# Altium PCB Power_MUX_PCB.PcbDoc (part 1 of 2)
Units mm, origin at the board's own origin, x right, y up, seen from the top; angles counter-clockwise.
Board outline 240.97 x 124.5 mm, 4 copper layers (Top Layer, Layer2_GND, Layer3_Inner, Bottom Layer 1), stack 1.548 mm thick; 112 components, 60 nets, 297 pads, 576 vias.
Unrouted connection lines stored in the file: 2.
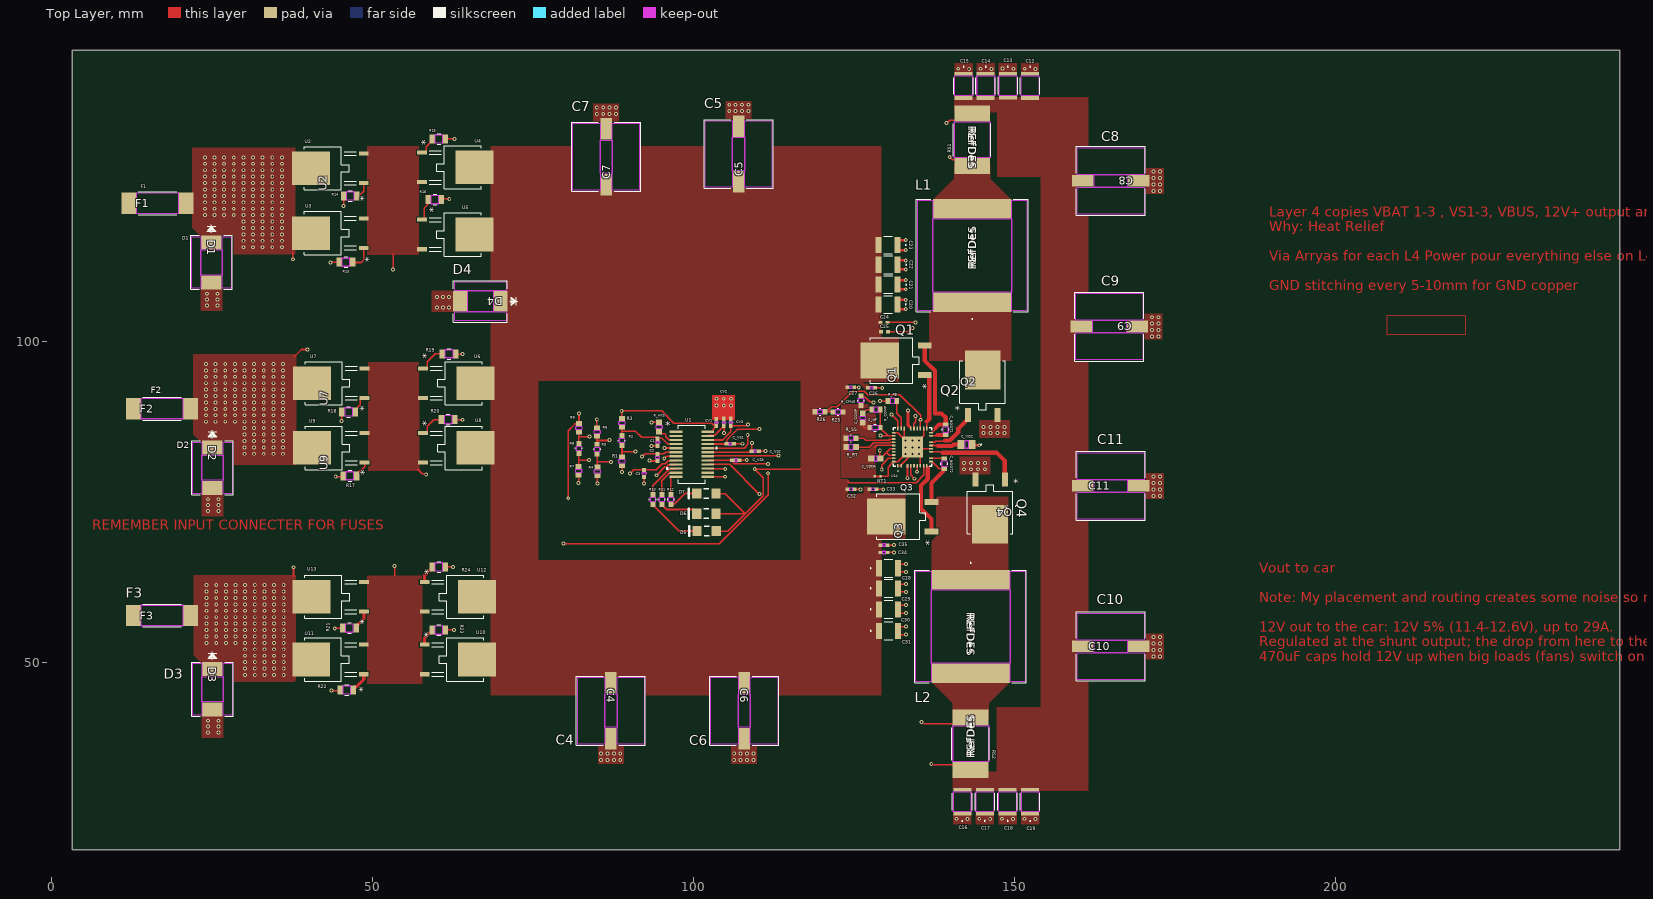
[diagram p0: Top Layer view]
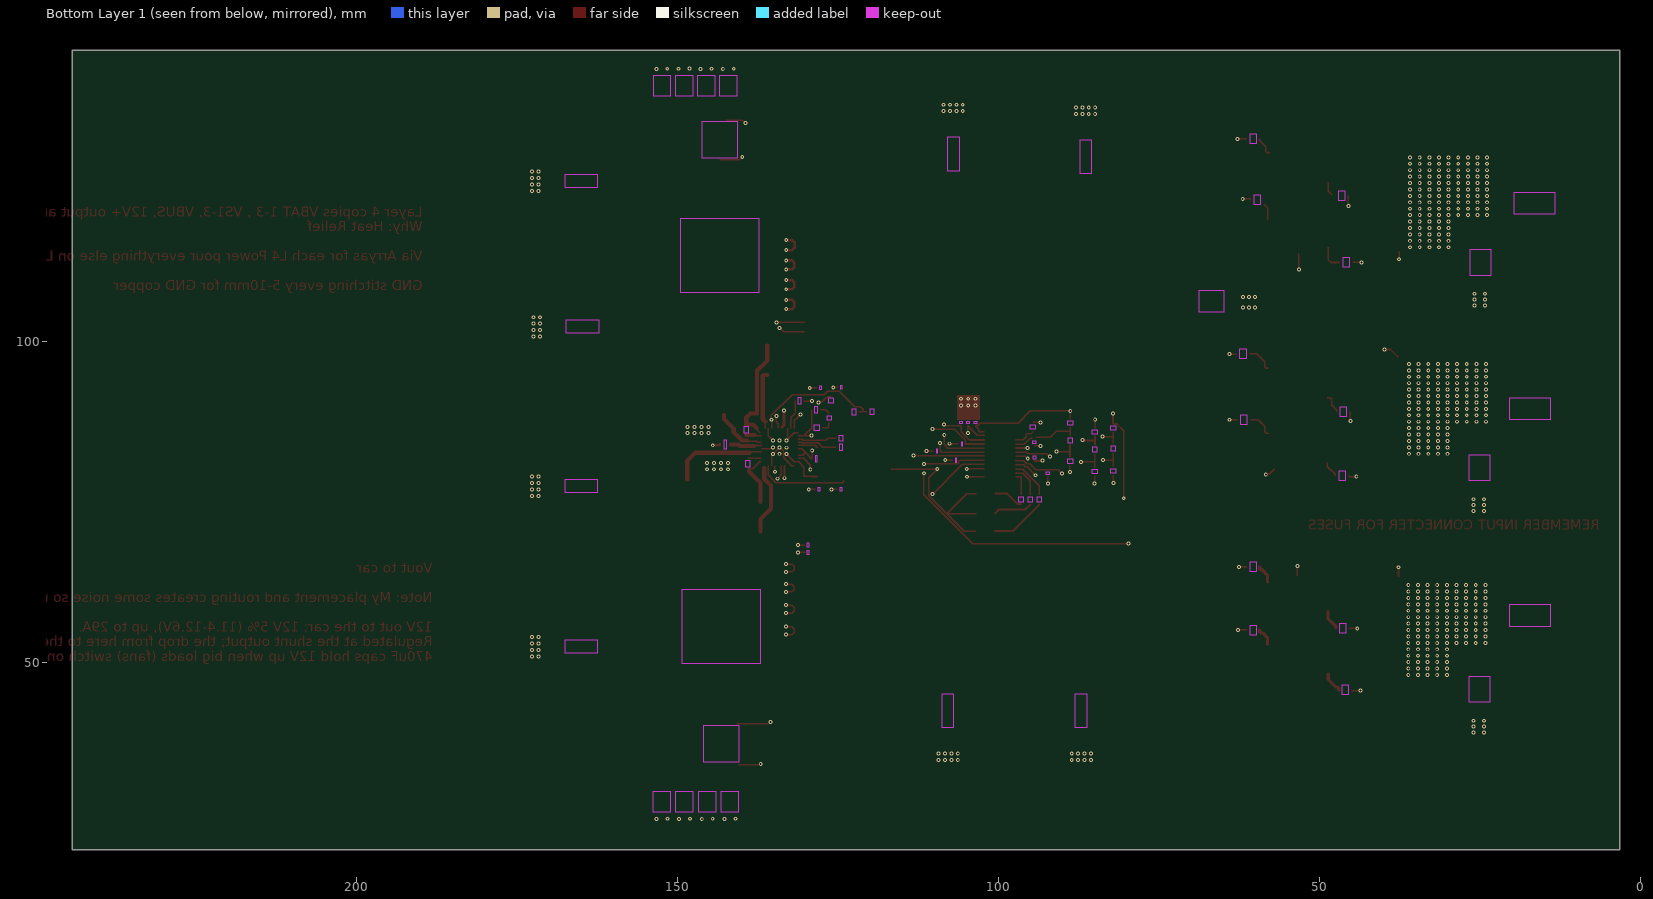
[diagram p1: Bottom Layer 1 view, seen from below]
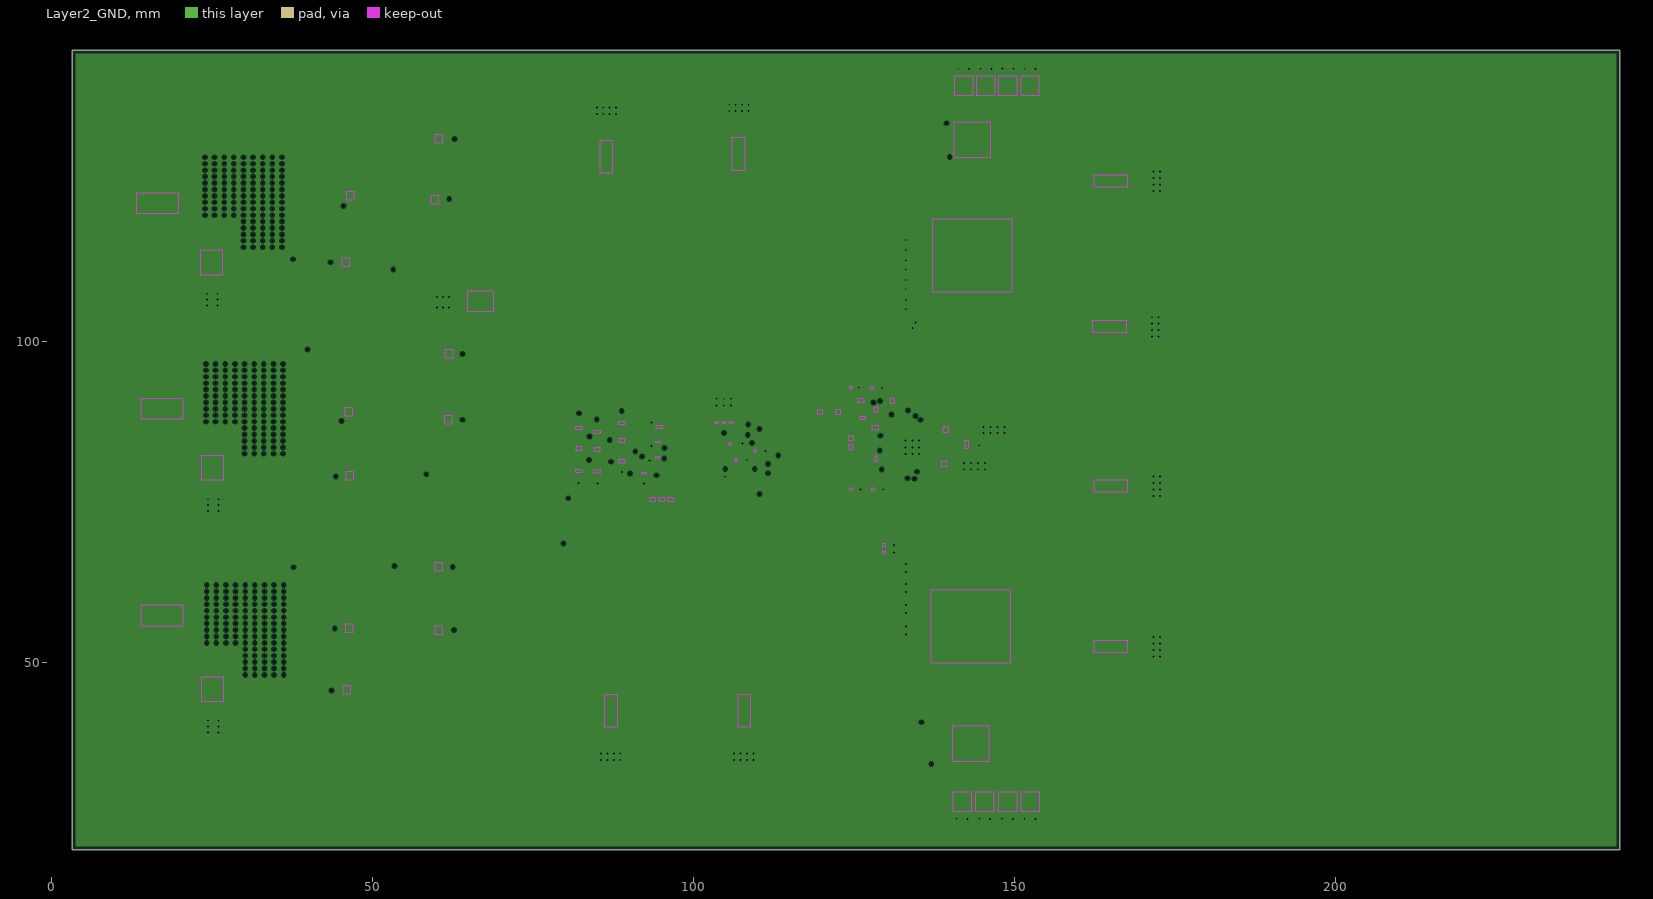
[diagram p2: Layer2_GND, clearances drawn from the general rule]
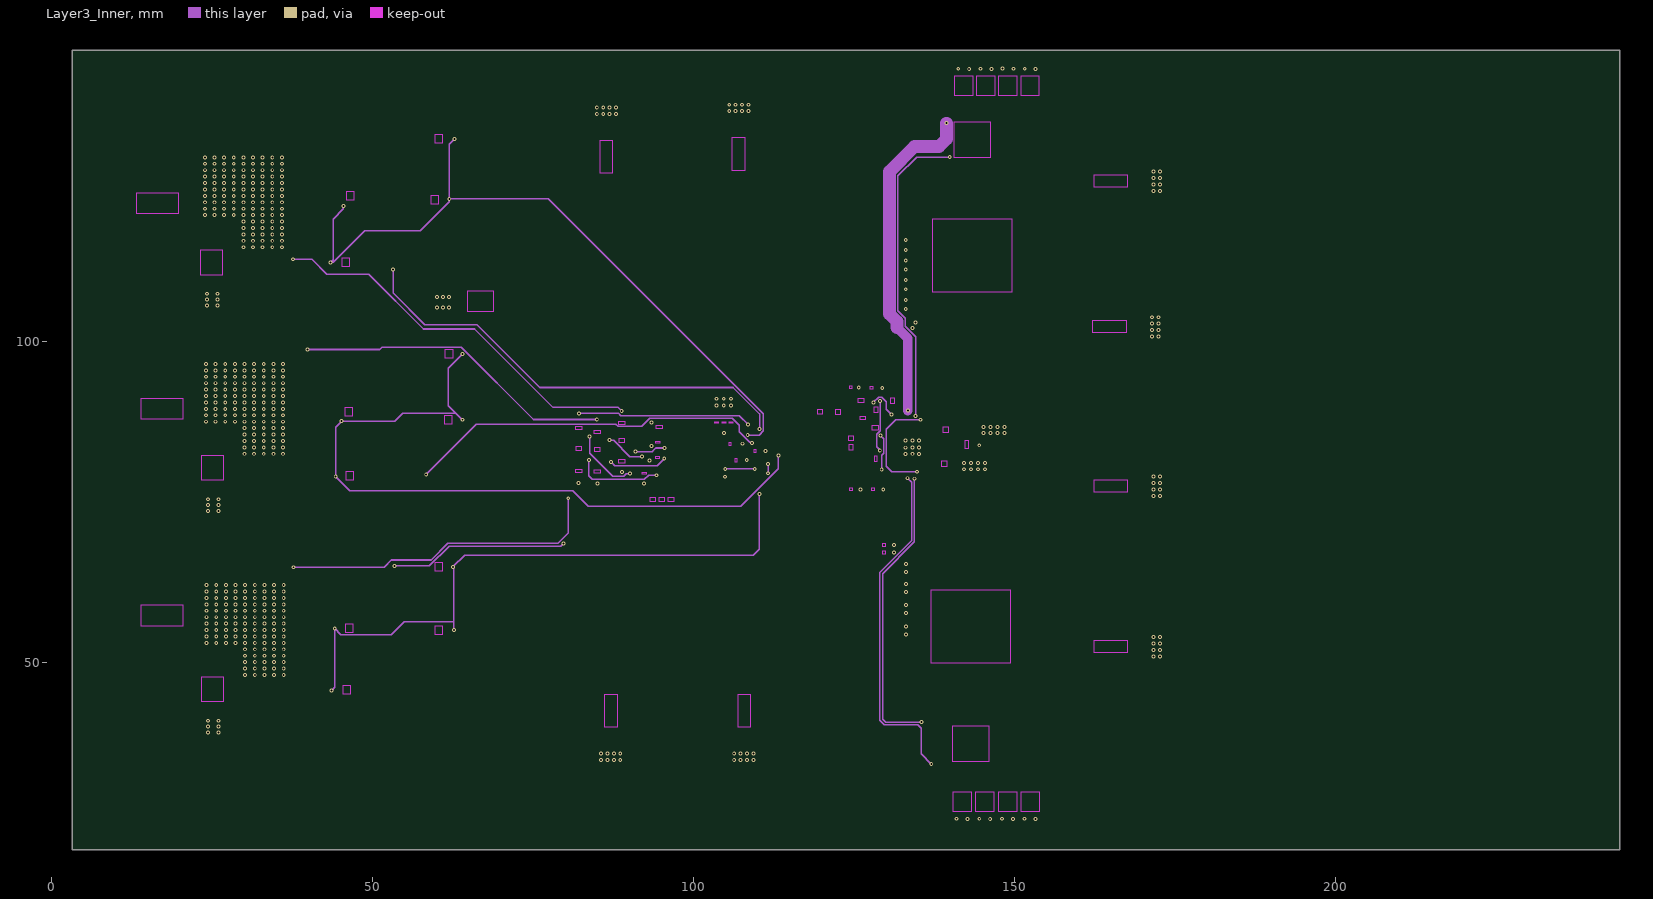
[diagram p3: Layer3_Inner]
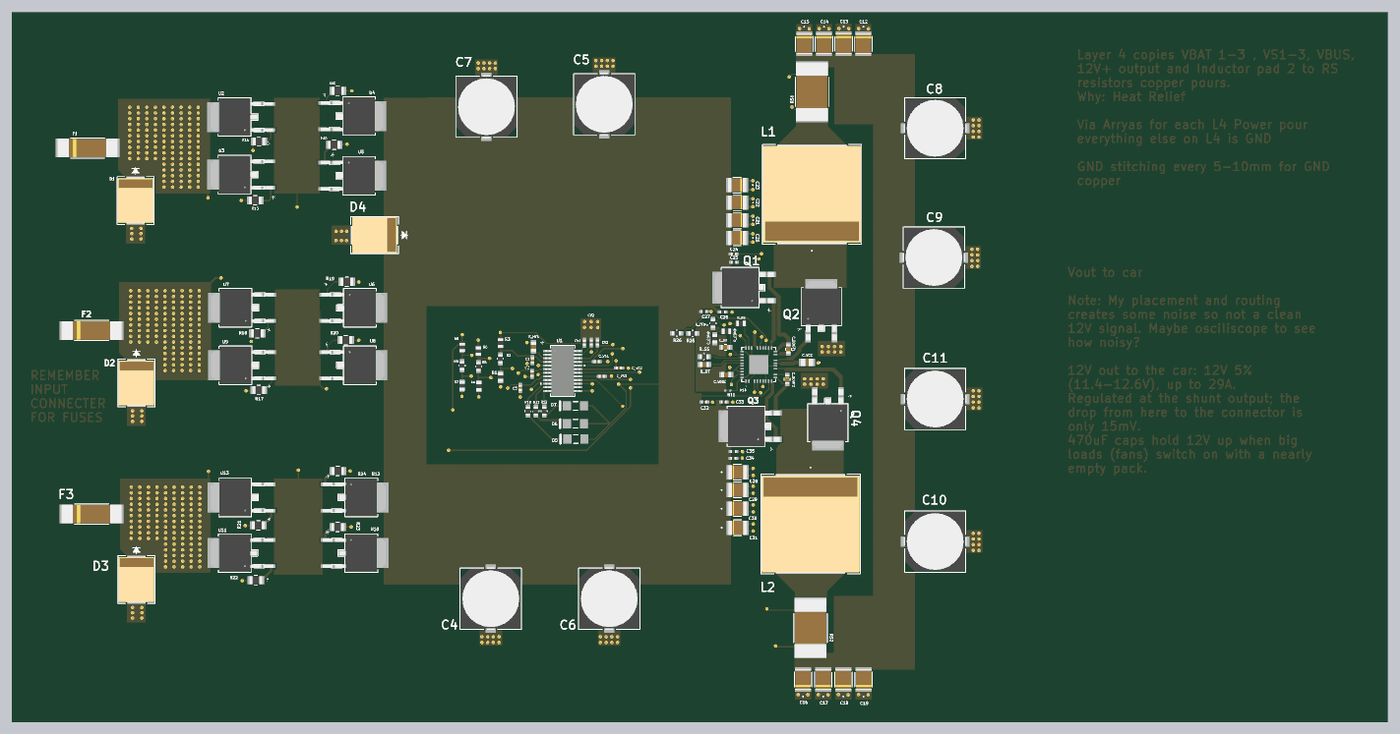
[diagram p5: 3D render of the assembled board from above, using the file's embedded part models]

## Layer stack, top to bottom
Top Solder: solder mask 0.0102, Solder Resist, Dk 3.5
Top Layer: signal copper 0.07
Dielectric 2: prepreg 0.0711, PP-006, Dk 4.1
Layer2_GND: plane copper 0.018, net GND
Dielectric 1: dielectric 1.23, FR-4, Dk 4.8
Layer3_Inner: signal copper 0.018
Dielectric 3: prepreg 0.0711, PP-006, Dk 4.1
Bottom Layer 1: signal copper 0.07
Bottom Solder: solder mask 0.0102, Solder Resist, Dk 3.5

## Board outline
3.275,20.825 3.275,145.325 244.25,145.325 244.25,20.825

## Design rules (kind name [scope] priority, off if disabled: settings)
Clearance [All] p1: gap=0.2 ignorepadtopadclearanceinfootprint=FALSE
PlaneClearance [All] p1: clearance=0.3
PlaneConnect [All] p1: planeconnectstyle=Direct reliefexpansion=0.3 reliefentries=4 reliefconductorwidth=0.5 reliefairgap=0.254
PolygonConnect [All] p1: connectstyle=Direct reliefconductorwidth=0.254 reliefentries=4 polygonreliefangle="90 Angle" airgapwidth=0.254
RoutingVias [All] p1: holewidth=0.3 width=0.6 viastyle="Through Hole" minholewidth=0.3 minwidth=0.6 maxholewidth=0.6 maxwidth=0.6
SolderMaskExpansion [All] p1: expansion=0 istentingtop=FALSE
SupplyNets "Schematic Supply Nets_2" [InNet('GND')] p1: voltage=0.000
SupplyNets "Schematic Supply Nets_1" [InNet('AGND')] p2: voltage=0.000
SupplyNets "Schematic Supply Nets" [InNet('VDDA')] p3: voltage=0.000
UnRoutedNet [All] p1: checkbadconnections=TRUE
Width [All] p1: maxlimit=3 minlimit=0.2 preferedwidth=0.2
27 further rules are at their usual default settings.

## Classes and differential pairs
component class FET_PowerPath: C_VS1 C_VS2 C_VS3 R13 R14 R15 R16 R17 R18 R19 R20 R21 R22 R23 R24 U2 U3 U4 U5 U6 U7 U8 U9 U10 U11 U12 U13
component class Buck_Converter: C8 C9 C10 C11 C12 C13 C14 C15 C16 C18 C19 C21 C22 C23 C24 C25 C26 C27 C28 C29 C30 C31 C32 C33 C34 C35 C_BOOT1 C_BOOT2 C_COMP C_HF C_VCC C_VDDA L1 L2 NT1 Q1 Q2 Q3 Q4 R25 R26 R_CFNG R_COMP R_FB R_RT R_SS RS1 RS2 U14
component class Battery_Logic: C4 C5 C6 C7 D4 D5 D6 D7 R10 R11 R12 R_HYS U1
component class BAT_Input: C1 C2 C3 CV1 CV2 CV3 D1 D2 D3 F1 F2 F3 J1 J2 J3 R1 R2 R3 R4 R5 R6 R7 R8 R9

## Components (designator, comment, footprint, x,y, rotation, side; value= is the part's Value field where it differs from the comment)
C1 "100pF" CAP_CC0402_YAG 94.425,84.315 r270 top
C2 "100pF" CAP_CC0402_YAG 94.4,81.925 r270 top
C3 "100pF" CAP_CC0402_YAG 92.321,79.45 r90 top
C4 "470uF" CAP_EEHZ-G16_PAN 87.15,42.475 r270 top
C5 "470uF" CAP_EEHZ-G16_PAN 107.025,129.2 r90 top
C6 "470uF" CAP_EEHZ-G16_PAN 107.9,42.475 r270 top
C7 "470uF" CAP_EEHZ-G16_PAN 86.4,128.775 r90 top
C8 "470uF" CAP_EEHZ-G16_PAN 165,125 r180 top
C9 "470uF" CAP_EEHZ-G16_PAN 164.775,102.325 r180 top
C10 "470uF" CAP_EEHZ-G16_PAN 165,52.5 r0 top
C11 "470uF" CAP_EEHZ-G16_PAN 165,77.5 r0 top
C12 "22uF" CAP_CGA6_TDK 152.425,139.8 r270 top
C13 "22uF" CAP_CGA6_TDK 148.975,139.825 r270 top
C14 "22uF" CAP_CGA6_TDK 145.525,139.8 r270 top
C15 "22uF" CAP_CGA6_TDK 142.075,139.8 r270 top
C16 "22uF" CAP_CGA6_TDK 141.875,28.3 r90 top
C17 "22uF" CAP_CGA6_TDK 145.4,28.3 r90 top
C18 "22uF" CAP_CGA6_TDK 148.925,28.3 r90 top
C19 "22uF" CAP_CGA6_TDK 152.45,28.3 r90 top
C20 "10uF" CAP_CL32_SAM 130.3,105.775 r180 top
C21 "10uF" CAP_CL32_SAM 130.325,108.85 r180 top
C22 "10uF" CAP_CL32_SAM 130.325,111.95 r180 top
C23 "10uF" CAP_CL32_SAM 130.3,115.025 r180 top
C24 "10nF" G-155_MUR#1 129.695,102.95 r0 top
C25 "10nF" G-155_MUR#1 129.754,101.5 r0 top
C26 "10nF" G-155_MUR#2 127.75,92.775 r0 top
C27 "10nF" G-155_MUR#2 124.5,92.85 r0 top
C28 "10uF" CAP_CL32_SAM 130.375,64.675 r0 top
C29 "10uF" CAP_CL32_SAM 130.375,61.55 r0 top
C30 "10uF" CAP_CL32_SAM 130.375,58.275 r0 top
C31 "10uF" CAP_CL32_SAM 130.375,54.925 r0 top
C32 "10nF" G-155_MUR#2 124.55,76.975 r180 top
C33 "10nF" G-155_MUR#2 127.975,76.975 r180 top
C34 "10nF" G-155_MUR#2 129.65,67.125 r180 top
C35 "10nF" G-155_MUR#2 129.675,68.275 r180 top
C_BOOT1 "0.47uF" CAP_CL10_SAM 139.299,86.25 r90 top
C_BOOT2 "0.47uF" CAP_CL10_SAM 139.074,80.95 r270 top
C_COMP "1.5nF" G-188_MUR 126.374,88.075 r270 top
C_HF "68pF" CAP_CL10_SAM 128.299,86.575 r180 top
C_VCC "4.7uF" CAP_TMK212AB7475KG-T_TAY 142.549,83.95 r180 top
C_VDDA "1uF" CAPC17595_90N_KEM 128.399,81.746 r180 top
C_VS1 "0.1uF" CAP_GCM1555_0402_MUR 105.725,84.05 r0 top
C_VS2 "0.1uF" CAP_GCM1555_0402_MUR 109.621,82.925 r0 top
C_VS3 "0.1uF" CAP_GCM1555_0402_MUR 106.6,81.5 r0 top
CV1 "0.1uF" CAP_GCM1555_0402_MUR 103.56,87.381 r270 top
CV2 "0.1uF" CAP_GCM1555_0402_MUR 104.75,87.4 r270 top
CV3 "0.1uF" CAP_GCM1555_0402_MUR 105.825,87.4 r270 top
D1 "SMCJ22CA" SMCJSeries_LTF 24.925,112.325 r270 top
D2 "SMCJ22CA" SMCJSeries_LTF 25.075,80.325 r270 top
D3 "SMCJ22CA" SMCJSeries_LTF 25.075,45.825 r270 top
D4 "SMCJ22CA" SMCJSeries_LTF 66.8,106.25 r180 top
D5 "597-3311-407F" DIAL-597-3311-407F_V 102.07,70.475 r180 top
D6 "597-3311-407F" DIAL-597-3311-407F_V 102,73.175 r180 top
D7 "597-3311-407F" DIAL-597-3311-407F_V 102,76.3 r180 top
F1 "SF-3812F4000T-2" FUSE_L20A_BRN 16.525,121.525 r0 top
F2 "SF-3812F4000T-2" FUSE_L20A_BRN 17.225,89.525 r0 top
F3 "SF-3812F4000T-2" FUSE_L20A_BRN 17.225,57.325 r0 top
L1 "IHLP6767GZER6R8M01" IND_IHLP-6767GZ_VIS 143.424,113.4 r90 top
L2 "IHLP6767GZER6R8M01" IND_IHLP-6767GZ_VIS 143.174,55.598 r270 top
NT1 "" NetTie 128.699,78.975 r0 top net-tie
Q1 "RD3G07BBG" DPAK_TO-252_ROM 130.849,97.05 r90 top
Q2 "RD3G07BBG" DPAK_TO-252_ROM 145.049,93.7 r0 top
Q3 "RD3G07BBG" DPAK_TO-252_ROM 131.899,72.725 r90 top
Q4 "RD3G07BBG" DPAK_TO-252_ROM 146.199,73.35 r180 top
R1 "475k" STA_RMCF0603_STP 88.85,81.35 r90 top
R2 "237K" RC0603N_PAN 88.85,84.547 r270 top
R3 "10M" RES_CRCW_0603 88.85,87.325 r90 top
R4 "475k" STA_RMCF0603_STP 85.05,79.75 r90 top
R5 "237K" RC0603N_PAN 85,83.2 r270 top
R6 "10M" RES_CRCW_0603 85,85.9 r90 top
R7 "475k" STA_RMCF0603_STP 82.125,79.825 r90 top
R8 "237K" RC0603N_PAN 82.15,83.347 r270 top
R9 "10M" RES_CRCW_0603 82.15,86.55 r90 top
R10 "20K" RC0603N_PAN 93.675,75.374 r270 top
R11 "20K" RC0603N_PAN 95.075,75.373 r270 top
R12 "20K" RC0603N_PAN 96.5,75.374 r270 top
R13 "10" RES_CRCW_0805 45.875,112.35 r180 top
R14 "10" RES_CRCW_0805 46.55,122.675 r180 top
R15 "10" RES_CRCW_0805 60.35,131.55 r0 top
R16 "10" RES_CRCW_0805 59.726,122.1 r0 top
R17 "10" RES_CRCW_0805 46.5,79.075 r180 top
R18 "10" RES_CRCW_0805 46.275,89.025 r180 top
R19 "10" RES_CRCW_0805 61.925,98.075 r0 top
R20 "10" RES_CRCW_0805 61.775,87.825 r0 top
R21 "10" RES_CRCW_0805 46.425,55.35 r180 top
R22 "10" RES_CRCW_0805 45.999,45.725 r180 top
R23 "10" RES_CRCW_0805 60.326,55.05 r0 top
R24 "10" RES_CRCW_0805 60.35,64.875 r0 top
R25 "21K" RC0603N_YAG 122.524,89.025 r180 top
R26 "309K" RC0603N_PAN 119.724,89.05 r180 top
R_CFNG "41.2K" RC0603N_PAN 126.1,90.775 r90 top
R_COMP "56.2K" RES_CRCW_0603 128.449,89.375 r0 top
R_FB "48.7K" RES_CRCW_0603 130.974,90.75 r180 top
R_HYS "182k" RES_RMCF0603_STP 94.65,86.675 r270 top
R_RT "115K" RES_RMCF0603_STP 124.549,83.55 r180 top
R_SS "95.3K" RC0603N_PAN 124.524,84.925 r0 top
RS1 "2.5m" RES_WSLP3921_.002OHM_VIS 143.424,131.389 r270 top
RS2 "2.5m" RES_WSLP3921_.002OHM_VIS 143.174,37.325 r90 top
U1 "LTC4417IGN#TRPBF" SSOP-24_GN_LIT 99.75,82.425 r0 top
U2 "TJ90S04M3L,LXHQ" DPAK+_TOS 42.275,126.975 r90 top
U3 "TJ90S04M3L,LXHQ" DPAK+_TOS 42.275,116.875 r90 top
U4 "TJ90S04M3L,LXHQ" DPAK+_TOS 64.075,127.125 r270 top
U5 "TJ90S04M3L,LXHQ" DPAK+_TOS 64.075,116.675 r270 top
U6 "TJ90S04M3L,LXHQ" DPAK+_TOS 64.225,93.5 r270 top
U7 "TJ90S04M3L,LXHQ" DPAK+_TOS 42.425,93.5 r90 top
U8 "TJ90S04M3L,LXHQ" DPAK+_TOS 64.225,83.425 r270 top
U9 "TJ90S04M3L,LXHQ" DPAK+_TOS 42.425,83.425 r90 top
U10 "TJ90S04M3L,LXHQ" DPAK+_TOS 64.475,50.475 r270 top
U11 "TJ90S04M3L,LXHQ" DPAK+_TOS 42.3,50.475 r90 top
U12 "TJ90S04M3L,LXHQ" DPAK+_TOS 64.475,60.225 r270 top
U13 "TJ90S04M3L,LXHQ" DPAK+_TOS 42.35,60.225 r90 top
U14 "LM5137QRHARQ1" LM5137QRHARQ1 134.099,83.55 r90 top

## Footprints (in the part's own frame and the unit in brackets; to place one, negate y for a bottom-side part, rotate by r counter-clockwise, add the part's x,y. Pads: shape width x height; smd on the part's side, far side on the other; paste and mask are expansions set on the pad)
CAP_CC0402_YAG [mil]
  rect 26x24 smd paste+0 mask+0: 1(-21.5,0) 2(21.5,0)
  Top Layer keep-out region: -6.5,-10 -6.5,10 6.5,10 6.5,-10
  Keep-Out Layer region: -6.5,-12 -6.5,12 6.5,12 6.5,-12
  body extent -21,-12 21,12, height 22
CAP_CGA6_TDK [mil]
  rect 21.78x110 smd paste+0 mask+0: 1(-73.89,0) 2(73.89,0)
  Top Layer keep-out region: -61,-53 -61,53 61,53 61,-53
  Keep-Out Layer region: -61,-55 -61,55 61,55 61,-55
  silkscreen extent -121,-60 51,60, body extent -71,-55 71,55, height 110
CAP_CL10_SAM [mm]
  rect 0.656x0.8 smd paste+0 mask+0: 1(-0.828,0) 2(0.828,0)
  Top Layer keep-out region: -0.449,-0.349 -0.449,0.349 0.449,0.349 0.449,-0.349
  Keep-Out Layer region: -0.449,-0.4 -0.449,0.4 0.449,0.4 0.449,-0.4
  silkscreen extent -0.19,-0.53 0.19,0.53, body extent -0.8,-0.4 0.8,0.4, height 0.9
CAP_CL32_SAM [mm]
  rect 0.95x2.5 smd paste+0 mask+0: 1(-1.475,0) 2(1.475,0)
  silkscreen extent -2.86,-1.38 0.69,1.38, body extent -1.6,-1.25 1.6,1.25, height 1
CAP_EEHZ-G16_PAN [mil]
  rect 132x71 smd paste+0 mask+0: 1(-170.5,0) 2(170.5,0)
  Top Layer keep-out region: -102.5,-37.5 -102.5,37.5 102.5,37.5 102.5,-37.5
  Top Layer keep-out region: -204.5,37.5 -204.5,204.5 204.5,204.5 204.5,37.5
  Top Layer keep-out region: -204.5,-204.5 -204.5,-37.5 204.5,-37.5 204.5,-204.5
  Keep-Out Layer region: -102.5,-37.5 -102.5,37.5 102.5,37.5 102.5,-37.5
  silkscreen extent -212,-212 212,212, body extent -216,-206 216,206, height 675
CAP_GCM1555_0402_MUR [mil]
  rect 28x22 smd paste+0 mask+0: 1(-20.5,0) 2(20.5,0)
  Top Layer keep-out region: -4.5,-9 -4.5,9 4.5,9 4.5,-9
  Keep-Out Layer region: -4.5,-11 -4.5,11 4.5,11 4.5,-11
  body extent -21,-11 21,11, height 22
CAP_TMK212AB7475KG-T_TAY [mil]
  rect 44x53 smd paste+0 mask+0: 1(-33.5,0) 2(33.5,0)
  Top Layer keep-out region: -9.5,-24.5 -9.5,24.5 9.5,24.5 9.5,-24.5
  Keep-Out Layer region: -9.5,-26.5 -9.5,26.5 9.5,26.5 9.5,-26.5
  silkscreen extent -92,-3 -86,3, body extent -41,-26 41,26, height 53
CAPC17595_90N_KEM [mm]
  rect 1x0.95 smd paste+0 mask+0: 1(-0.725,0) 2(0.725,0)
  Top Layer keep-out region: -0.174,-0.424 -0.174,0.424 0.174,0.424 0.174,-0.424
  Keep-Out Layer region: -0.174,-0.475 -0.174,0.475 0.174,0.475 0.174,-0.475
  body extent -0.87,-0.48 0.87,0.48, height 0.9
DIAL-597-3311-407F_V [mm] "SMD, 2-Leads, Body 1.5x3mm"
  rect 1.42x1.6 smd: 1(-1.49,0) 2(1.49,0)
  silkscreen extent -0.38,-0.75 2.7,0.75, body extent -1.5,-0.75 1.5,0.75, height 1.5
DPAK+_TOS [mm]
  rect 0.651x1.511 smd paste+0 mask+0: 1(-2.3,-6.35) 3(2.3,-6.35)
  rect 5.251x5.911 smd paste+0 mask+0: 2(0,1.828)
  silkscreen extent -3.38,-5.24 3.38,2.88, body extent -3.25,-6.75 3.25,4.25, height 2.3
DPAK_TO-252_ROM [mil]
  rect 36.97x84.56 smd paste+0 mask+0: 1(-90.55,-203.5) 3(90.55,-203.5)
  rect 219x237 smd paste+0 mask+0: 2(0,72.68)
  silkscreen extent -139,-170 139,131, body extent -134,-232 134,177, height 94
FUSE_L20A_BRN [mil]
  rect 91x130 smd paste+0 mask+0: 1(-175,0) 2(175,0)
  Top Layer keep-out region: -127.5,-63 -127.5,63 127.5,63 127.5,-63
  Keep-Out Layer region: -127.5,-65 -127.5,65 127.5,65 127.5,-65
  silkscreen extent -117,-70 117,70, body extent -206,-65 206,65, height 112
G-155_MUR#1 [mil]
  rect 24x20 smd paste+0 mask+0: 1(-21.5,0) 2(21.5,0)
  body extent -19,-10 19,10, height 22
G-155_MUR#2 [mil]
  rect 24x20 smd paste+0 mask+0: 1(-21.5,0) 2(21.5,0)
  Top Layer keep-out region: -7.5,-8 -7.5,8 7.5,8 7.5,-8
  Keep-Out Layer region: -7.5,-10 -7.5,10 7.5,10 7.5,-10
  body extent -19,-10 19,10, height 22
G-188_MUR [mil]
  rect 34x32 smd paste+0 mask+0: 1(-28.5,0) 2(28.5,0)
  Top Layer keep-out region: -9.5,-14 -9.5,14 9.5,14 9.5,-14
  Keep-Out Layer region: -9.5,-16 -9.5,16 9.5,16 9.5,-16
  body extent -31,-16 31,16, height 35
IND_IHLP-6767GZ_VIS [mil]
  rect 119x480 smd paste+0 mask+0: 1(-286.5,0) 2(286.5,0)
  Top Layer keep-out region: -225,-242 -225,242 225,242 225,-242
  Top Layer keep-out region: -338,242 -338,335.5 338,335.5 338,242
  Top Layer keep-out region: -338,-335.5 -338,-242 338,-242 338,-335.5
  Keep-Out Layer region: -225,-242 -225,242 225,242 225,-242
  silkscreen extent -393,-342 345,342, body extent -340,-337 340,337, height 278
LM5137QRHARQ1 [mm]
  rect 0.6x0.25 smd: 1(-2.9,2.25) 2(-2.9,1.75) 4(-2.9,0.25) 5(-2.9,-0.25) 6(-2.9,-0.75) 7(-2.9,-1.25) 8(-2.9,-1.75) 9(-2.9,-2.25) 18(2.9,-2.25) 19(2.9,-1.75) 20(2.9,-1.25) 21(2.9,-0.75) 22(2.9,-0.25) 23(2.9,0.25) 25(2.9,1.75) 26(2.9,2.25)
  rect 0.6x0.27 smd: 3(-2.9,0.75) 24(2.9,1.25)
  rect 0.25x0.6 smd: 10(-2.25,-2.9) 11(-1.75,-2.9) 12(-0.75,-2.9) 13(-0.25,-2.9) 14(0.25,-2.9) 15(0.75,-2.9) 16(1.75,-2.9) 17(2.25,-2.9) 27(2.25,2.9) 28(1.75,2.9) 30(0.75,2.9) 31(0.25,2.9) 32(-0.25,2.9) 33(-0.75,2.9) 35(-1.75,2.9) 36(-2.25,2.9)
  rect 0.27x0.6 smd: 29(1.25,2.9) 34(-1.25,2.9)
  rect 3.3x3.3 smd: 37(0,0)
  silkscreen extent -3.8,-3 3,3
NetTie [mm] "Net Tie for AGND and GND"
  rrect50% 0.4x0.4 smd: 1(-0.455,0) 2(0.45,0)
  Top Layer lines w0.3: -0.455,0 0.45,0
RC0603N_PAN [mm]
  rect 0.756x0.8 smd paste+0 mask+0: 1(-0.778,0) 2(0.778,0)
  Top Layer keep-out region: -0.349,-0.349 -0.349,0.349 0.349,0.349 0.349,-0.349
  Keep-Out Layer region: -0.349,-0.4 -0.349,0.4 0.349,0.4 0.349,-0.4
  silkscreen extent -0.09,-0.53 0.09,0.53, body extent -0.8,-0.4 0.8,0.4, height 0.71
RC0603N_YAG [mil]
  rect 30x32 smd paste+0 mask+0: 1(-30.5,0) 2(30.5,0)
  Top Layer keep-out region: -13.5,-14 -13.5,14 13.5,14 13.5,-14
  Keep-Out Layer region: -13.5,-16 -13.5,16 13.5,16 13.5,-16
  silkscreen extent -3,-21 3,21, body extent -31,-16 31,16, height 28
RES_CRCW_0603 [mil]
  rect 28x37 smd paste-18.5 mask-18.5: 1(-26.5,0) 2(26.5,0)
  Top Layer keep-out region: -10.5,-16.5 -10.5,16.5 10.5,16.5 10.5,-16.5
  Keep-Out Layer region: -10.5,-18.5 -10.5,18.5 10.5,18.5 10.5,-18.5
  body extent -33,-19 33,19, height 20
RES_CRCW_0805 [mil]
  rect 33.78x55 smd paste+0 mask+0: 1(-40.39,0) 2(40.39,0)
  Top Layer keep-out region: -21.5,-25.5 -21.5,25.5 21.5,25.5 21.5,-25.5
  Keep-Out Layer region: -21.5,-27.5 -21.5,27.5 21.5,27.5 21.5,-27.5
  silkscreen extent -11,-32 11,32, body extent -44,-27 44,27, height 20
RES_RMCF0603_STP [mil]
  rect 34x37 smd paste+0 mask+0: 1(-30.5,0) 2(30.5,0)
  Top Layer keep-out region: -11.5,-16.5 -11.5,16.5 11.5,16.5 11.5,-16.5
  Keep-Out Layer region: -11.5,-18.5 -11.5,18.5 11.5,18.5 11.5,-18.5
  body extent -34,-19 34,19, height 22
RES_WSLP3921_.002OHM_VIS [mil]
  rect 98x220 smd paste+0 mask+0: 1(-161,0) 2(161,0)
  Top Layer keep-out region: -110,-108 -110,108 110,108 110,-108
  Keep-Out Layer region: -110,-110 -110,110 110,110 110,-110
  silkscreen extent -100,-115 100,115, body extent -202,-110 202,110, height 47
SMCJSeries_LTF [mil]
  rect 86x126 smd paste+0 mask+0: 1(-123,0) 2(123,0)
  Top Layer keep-out region: -78,-65 -78,65 78,65 78,-65
  Top Layer keep-out region: -158,65 -158,120.5 158,120.5 158,65
  Top Layer keep-out region: -158,-120.5 -158,-65 158,-65 158,-120.5
  Keep-Out Layer region: -78,-65 -78,65 78,65 78,-65
  silkscreen extent -230,-128 165,127, body extent -160,-123 160,123, height 105
SSOP-24_GN_LIT [mil]
  rect 78x14 smd paste+0 mask+0: 1(-97,137.5) 2(-97,112.5) 3(-97,87.5) 4(-97,62.5) 5(-97,37.5) 6(-97,12.5) 7(-97,-12.5) 8(-97,-37.5) 9(-97,-62.5) 10(-97,-87.5) 11(-97,-112.5) 12(-97,-137.5) 13(97,-137.5) 14(97,-112.5) 15(97,-87.5) 16(97,-62.5) 17(97,-37.5) 18(97,-12.5) 19(97,12.5) 20(97,37.5) 21(97,62.5) 22(97,87.5) 23(97,112.5) 24(97,137.5)
  silkscreen extent -156,-177 156,177, body extent -122,-172 122,172, height 67
STA_RMCF0603_STP [mil]
  rect 28x37 smd paste+0 mask+0: 1(-27.5,0) 2(27.5,0)
  Top Layer keep-out region: -11.5,-16.5 -11.5,16.5 11.5,16.5 11.5,-16.5
  Keep-Out Layer region: -11.5,-18.5 -11.5,18.5 11.5,18.5 11.5,-18.5
  body extent -34,-19 34,19, height 22

## Part data
C1 C2 C3: library part CC0402JRNPO9BN101, "CAPACITOR; SMT (0402); CERAMIC CHIP; 100PF; 50V; TOL=5%; TG=-55 DEGC TO +125 DEGC; TC=C0G", Manufacturer_Name=Yageo, Copyright="Copyright (C) 2025 Ultra Librarian. All rights reserved.", Manufacturer_Part_Number=CC0402JRNPO9BN101
C4 C5 C6 C7 C8 C9 C10 C11: library part EEHZU1V471V, "Description", Manufacturer_Name=Panasonic, Copyright="Copyright (C) 2025 Ultra Librarian. All rights reserved.", Manufacturer_Part_Number=EEHZU1V471V
C12 C13 C14 C15 C16 C17 C18 C19: library part CGA6P3X7R1E226M250AB, "Description", Manufacturer_Name=TDK, Copyright="Copyright (C) 2025 Ultra Librarian. All rights reserved.", Manufacturer_Part_Number=CGA6P3X7R1E226M250AB
C20 C21 C22 C23 C28 C29 C30 C31: library part CL32B106KBJNNNE, "Description", Manufacturer_Name=Samsung, Copyright="Copyright (C) 2025 Ultra Librarian. All rights reserved.", Manufacturer_Part_Number=CL32B106KBJNNNE
C24 C25 C26 C27 C32 C33 C34 C35: library part GCM155R71H103KA55D, "Description", Manufacturer_Name=Murata, Copyright="Copyright (C) 2025 Ultra Librarian. All rights reserved.", Manufacturer_Part_Number=GCM155R71H103KA55D
C_BOOT1 C_BOOT2: library part CL10B474KA8NFNC, "Description", Manufacturer_Name=Samsung, Copyright="Copyright (C) 2026 Ultra Librarian. All rights reserved.", Manufacturer_Part_Number=CL10B474KA8NFNC
C_COMP: library part GRM1885C1H152JA01D, "Description", Manufacturer_Name=Murata, Copyright="Copyright (C) 2025 Ultra Librarian. All rights reserved.", Manufacturer_Part_Number=GRM1885C1H152JA01D
C_HF: library part CL10C680JB8NNNC, "No Description Available", Manufacturer_Name=Samsung, Copyright="Copyright (C) 2026 Ultra Librarian. All rights reserved.", Manufacturer_Part_Number=CL10C680JB8NNNC
C_VCC: library part TMK212AB7475KG-T, "Description", Manufacturer_Name="Taiyo Yuden", Copyright="Copyright (C) 2025 Ultra Librarian. All rights reserved.", Manufacturer_Part_Number=TMK212AB7475KG-T
C_VDDA: library part C0603C105K4RACTU, "SMD Comm X7R, Ceramic, 1 uF, 10%, 16 VDC, X7R, SMD, MLCC, Temperature Stable, Class II, 0603", Manufacturer_Name=Kemet, Copyright="Copyright (C) 2026 Ultra Librarian. All rights reserved.", Manufacturer_Part_Number=C0603C105K4RACTU
C_VS1 C_VS2 C_VS3 CV1 CV2 CV3: library part GCM155R71H104KE02J, "Description", Manufacturer_Name=Murata, Copyright="Copyright (C) 2026 Ultra Librarian. All rights reserved.", Manufacturer_Part_Number=GCM155R71H104KE02J
D1 D2 D3 D4: "No Description Available", Manufacturer_Name="Littelfuse Inc", Copyright="Copyright (C) 2026 Ultra Librarian. All rights reserved.", Manufacturer_Part_Number=SMCJ22CA
D5 D6 D7: library part CMP-2000-05651-1, "LED Green, 75 mW, 30 mA, -30 to 85 degC, 2-Pin SMD, RoHS, Tape and Reel", Emitting Color=YellowGreen, Forward Current=30mA, Forward Voltage=2.5V, Manufacturer=Dialight, Operating Temp Range=-30Cto85C, Operating Temperature Classification=Commercial, Package Description="2-Pin Surface Mount Device, Body 1.5 x 3 mm", Package Type=SMD, Power Dissipation=75W, Reverse Voltage=4V, Test Current (It)=20mA, Chip Material=GaP, Datasheet URL=https://datasheet.ciiva.com/15117/getdatasheetpartid-142484-15117764.pdf, Datasheet Version=07/2002, DELETED=Compliant, High Brightness=No, Lens Dimensions=2x1.5x0.9mm, Lens Type=NonDiffused, Lum Intensity=7.5mcd, Luminous Intensity=7.5mcd, Main Category=ChipLED, Manufacturer URL=http://www.dialight.com/, Mounting=SurfaceMount, Mounting Technology=SurfaceMount, Number of  Elements=1, Package Reference=597-3311-407F, Packaging=TapeandReel, Peak Wavelength=560nm, Pin Count=2, Product Depth (mm)=1.5mm, Product Height (mm)=1.5mm, Product Length (mm)=3mm, Rad Hardened=No, Shape Type=Rectangular, Type=Uni-Color, Viewing Angle=70deg
F1 F2 F3: "Description", Manufacturer_Name="Bourns Electronics", Copyright="Copyright (C) 2026 Ultra Librarian. All rights reserved.", Manufacturer_Part_Number=SF-3812F4000T-2
L1 L2: "IHLP-6767GZ-01 6.8 20% ER E3", Manufacturer_Name=Vishay, Copyright="Copyright (C) 2025 Ultra Librarian. All rights reserved.", Manufacturer_Part_Number=IHLP6767GZER6R8M01
NT1: library part NetTie, "Net Tie for AGND and GND"
Q1 Q2 Q3 Q4: library part RD3G07BATTL1, "N-Channel", Manufacturer_Name="ROHM Semiconductor", Copyright="Copyright (C) 2026 Ultra Librarian. All rights reserved.", Manufacturer_Part_Number=RD3G07BATTL1, Type=Transistors
R1 R4 R7: library part RMCF0603FT475K, "No Description Available", Manufacturer_Name="Stackpole International", Copyright="Copyright (C) 2026 Ultra Librarian. All rights reserved.", Manufacturer_Part_Number=RMCF0603FT475K
R2 R5 R8: library part ERJ-3EKF2373V, "No Description Available", Manufacturer_Name=Panasonic, Copyright="Copyright (C) 2026 Ultra Librarian. All rights reserved.", Manufacturer_Part_Number=ERJ-3EKF2373V
R3 R6 R9: library part CRCW060310M0FKEA, "D11/CRCW0603 100 10M 1% ET1 e3", Manufacturer_Name=Vishay, Copyright="Copyright (C) 2025 Ultra Librarian. All rights reserved.", Manufacturer_Part_Number=CRCW060310M0FKEA
R10 R11 R12: library part ERJ-3EKF2002V, "Description", Manufacturer_Name=Panasonic, Copyright="Copyright (C) 2025 Ultra Librarian. All rights reserved.", Manufacturer_Part_Number=ERJ-3EKF2002V
R13 R14 R15 R16 R17 R18 R19 R20 R21 R22 R23 R24: library part CRCW080510R0FKEA, "D12/CRCW0805 100 10R 1% ET1 e3", Manufacturer_Name=Vishay, Copyright="Copyright (C) 2026 Ultra Librarian. All rights reserved.", Manufacturer_Part_Number=CRCW080510R0FKEA
R25: library part RC0603FR-0721KL, "No Description Available", Manufacturer_Name=Yageo, Copyright="Copyright (C) 2026 Ultra Librarian. All rights reserved.", Manufacturer_Part_Number=RC0603FR-0721KL
R26: library part ERJ-3EKF3093V, "No Description Available", Manufacturer_Name=Panasonic, Copyright="Copyright (C) 2026 Ultra Librarian. All rights reserved.", Manufacturer_Part_Number=ERJ-3EKF3093V
R_CFNG: library part ERJ-3EKF4122V, "Description", Manufacturer_Name=Panasonic, Copyright="Copyright (C) 2025 Ultra Librarian. All rights reserved.", Manufacturer_Part_Number=ERJ-3EKF4122V
R_COMP: library part CRCW060356K2FKEA, "No Description Available", Manufacturer_Name=Vishay, Copyright="Copyright (C) 2026 Ultra Librarian. All rights reserved.", Datasheet=https://www.vishay.com/doc?20035, Manufacturer_Part_Number=CRCW060356K2FKEA
R_FB: library part CRCW060348K7FKEA, "No Description Available", Manufacturer_Name=Vishay, Copyright="Copyright (C) 2026 Ultra Librarian. All rights reserved.", Datasheet=https://www.vishay.com/doc?20035, Manufacturer_Part_Number=CRCW060348K7FKEA
R_HYS: library part RMCF0603FT182K, "No Description Available", Manufacturer_Name="Stackpole International", Copyright="Copyright (C) 2026 Ultra Librarian. All rights reserved.", Manufacturer_Part_Number=RMCF0603FT182K
R_RT: library part RMCF0603FT115K, "No Description Available", Manufacturer_Name="Stackpole International", Copyright="Copyright (C) 2026 Ultra Librarian. All rights reserved.", Manufacturer_Part_Number=RMCF0603FT115K
R_SS: library part ERJ-3EKF9532V, "Description", Manufacturer_Name=Panasonic, Copyright="Copyright (C) 2026 Ultra Librarian. All rights reserved.", Manufacturer_Part_Number=ERJ-3EKF9532V
RS1 RS2: library part WSLP39212L500FEA, "WSLP3921 .0025 1% EA", Manufacturer_Name=Vishay, Copyright="Copyright (C) 2025 Ultra Librarian. All rights reserved.", Manufacturer_Part_Number=WSLP39212L500FEA
U1: library part LTC4417IGNTRPBF, "Prioritized PowerPathâ„¢ Controller", Manufacturer_Name="Analog Devices Inc", Copyright="Copyright (C) 2025 Ultra Librarian. All rights reserved.", Manufacturer_Part_Number=LTC4417IGN#TRPBF, RefDes=RefDes, Type=Type
U2 U3 U4 U5 U6 U7 U8 U9 U10 U11 U12 U13: "P-ch MOSFET, -40 V, -90 A, 0.0043 Î©@10V, DPAK+", Manufacturer_Name="Toshiba Electronic Devices & Storage Corp.", Copyright="Copyright (C) 2026 Ultra Librarian. All rights reserved.", Datasheet=https://toshiba.semicon-storage.com/info/docget.jsp?did=58174&prodName=TJ90S04M3L, Manufacturer_Part_Number=TJ90S04M3L,LXHQ, RefDes=RefDes, Type=Type
U14: "Switching Controllers Automotive, 80V, 100% duty-cycle capable dual-channel synchronous buck controller", Manufacturer_Name="Texas Instruments", Datasheet Link=https://www.ti.com/lit/ds/symlink/lm5137-q1.pdf?ts=1761300127638&ref_url=https%253A%252F%252Fwww.ti.com%252Fproduct%252FLM5137-Q1%252Fpart-details%252FLM5137QRHARQ1, Geometry.Height=1mm, Manufacturer_Part_Number=LM5137QRHARQ1

## Via types
v1: diameter 0.6, hole 0.3, Top Layer to Bottom Layer 1, 567 vias
v2: diameter 0.6, hole 0.3, Top Layer to Bottom Layer 1, tented both sides, 9 vias

## Nets (pads, with @x,y where several pads share a name; then routed paths per layer and width w, separated by ;. In a path a pad name is that pad's centre, name@x,y a point inside that pad or via, vN(x,y) a via of type N, cw(c..) or ccw(c..) an arc to the next point about the centre after c; other vN are vias at no path point)
AGND: C_COMP.2 C_HF.2 C_VDDA.2 NT1.1 R25.1 R_CFNG.1 R_RT.2 R_SS.1 U14.31 | length 4.9
  Top Layer w0.2: C_COMP.2@126.374,87.351 126.424,87.301 126.424,86.692 126.541,86.575 C_HF.2@127.471,86.575 ; 128.224,83.475 128.549,83.8 U14.31@131.199,83.8
BUCK_EN: R25.2 R26.1 U14.6 U14.20 | length 38.5
  Top Layer w0.2: R26.1@120.501,89.05 121.113,89.05 ; R25.2@121.749,89.025 121.724,89.05 121.113,89.05 ; v1(134.824,79.7) 134.836,79.712 134.836,80.638 U14.6@134.849,80.65 ; U14.20@135.349,86.45 135.361,86.463 135.361,87.788 v1(135.374,87.8) 135.374,88.474 132.147,91.7 128.847,91.7 128.832,91.685 127.17,91.685 126.624,92.231 124.781,92.231 122.4,89.85 121.524,89.85 121.113,89.439 121.113,89.05
  Layer3_Inner w0.2: v1(134.824,79.7) 130.87,79.7 130.028,80.542 130.028,86.3 131.528,87.8 v1(135.374,87.8)
GND: C1.2 C2.2 C3.1 C4.2 C5.2 C6.2 C7.2 C8.1 C9.1 C10.2 C11.2 C12.1 C13.1 C14.1 C15.1 C16.1 C17.1 C18.1 C19.1 C20.1 C21.1 C22.1 C23.1 C24.2 C25.2 C26.2 C27.2 C28.2 C29.2 C30.2 C31.2 C32.1 C33.1 C34.1 C35.1 C_VCC.1 C_VS1.2 C_VS2.2 C_VS3.2 CV1.1 CV2.1 CV3.1 D1.2 D2.2 D3.2 D4.2 NT1.2 Q2.3 Q4.3 R1.1 R4.1 R7.1 R_HYS.1 U1.13 U14.1 U14.2 U14.7 U14.13 U14.19 U14.24 U14.27 U14.36 U14.37 | length 78.9
  Top Layer w0.2: v1(82.1,77.975) 82.1,79.102 R7.1@82.125,79.127 ; v1(85.05,77.871) R4.1@85.05,79.052 ; v1@88.85,79.675 v1(88.875,79.65) 88.875,80.627 R1.1@88.85,80.652 ; C3.1@92.321,78.904 92.325,78.9 v1(92.325,77.85) ; v1(93.475,87.4) 94.6,87.4 R_HYS.1@94.65,87.45 ; U1.13@102.214,78.933 102.218,78.929 104.921,78.929 v1(104.925,78.925) ; C_VS1.2@106.246,84.05 106.258,84.063 107.637,84.063 v1(107.65,84.075) ; C_VS3.2@107.121,81.5 107.133,81.513 108.287,81.513 v1(108.3,81.525) ; C_VS2.2@110.141,82.925 v1(111.246,82.925) ; C27.2@125.046,92.85 125.056,92.84 125.74,92.84 v1(125.75,92.831) ; C32.1@125.096,76.975 125.109,76.963 126.013,76.963 v1(126.025,76.95) ; C26.2@128.296,92.775 128.309,92.763 129.397,92.763 v1(129.41,92.75) ; C33.1@128.521,76.975 128.54,76.956 129.544,76.956 v1(129.563,76.938) ; NT1.2@129.149,78.975 130.299,78.975 130.324,79 130.324,80.425 130.999,81.1 130.999,81.275 131.024,81.3 U14.36@131.199,81.3 131.849,81.3 U14.37@133.036,82.488 ; C34.1@130.196,67.125 130.209,67.138 131.213,67.138 v1(131.225,67.15) ; C35.1@130.221,68.275 v1(131.25,68.275) ; C24.2@130.241,102.95 130.253,102.962 134.562,102.962 v1(134.575,102.975) ; C25.2@130.3,101.5 133.451,101.5 134.031,102.079 v1(134.129,102.079) ; U14.27@131.199,85.8 131.849,85.8 132.849,84.8 U14.24@132.849,86.45 ; U14.1@131.849,80.65 U14.2@132.349,80.65 132.349,80.825 133.422,81.899 133.422,82.874 U14.37@134.099,83.55 134.099,83.5 v2(135.149,82.45) 135.199,82.45 135.349,82.3 U14.7@135.349,80.65 ; v1(133.125,54.35) 132.225,54.35 131.85,54.725 C31.2@131.85,54.925 131.85,55.2 132.225,55.575 v1(133.125,55.575) ; v1(133.125,57.7) 132.225,57.7 131.85,58.075 C30.2@131.85,58.275 131.85,58.55 132.225,58.925 v1(133.125,58.925) ; v1(133.125,60.975) 132.225,60.975 131.85,61.35 C29.2@131.85,61.55 131.85,61.825 132.225,62.2 v1(133.125,62.2) ; v1(133.125,64.1) 132.225,64.1 131.85,64.475 C28.2@131.85,64.675 131.85,64.95 132.225,65.325 v1(133.125,65.325) ; U14.37@135.124,84.575 135.849,85.3 U14.19@135.849,86.45 ; U14.37@135.149,83.3 U14.13@136.999,83.3
  Top Layer w0.3: v1(93.15,81.45) 93.231,81.45 93.304,81.377 C2.2@94.398,81.377 ; v1@93.505,83.755 C1.2@94.411,83.755
  Top Layer w0.4: v1(133.07,105.028) 132.175,105.028 131.8,105.403 131.8,105.775 131.8,106.103 132.175,106.478 v1(133.07,106.478) ; v1(133.07,108.136) 132.175,108.136 131.8,108.511 C21.1@131.8,108.85 131.8,109.186 132.175,109.561 v1(133.07,109.561) ; v1(133.07,111.227) 132.175,111.227 131.8,111.602 C22.1@131.8,111.95 131.8,112.252 132.175,112.627 v1(133.07,112.627) ; v1(133.07,114.235) 132.15,114.235 131.775,114.61 C23.1@131.775,115.025 131.775,115.41 132.15,115.785 v1(133.07,115.785) ; C_VCC.1@143.399,83.95 143.524,83.825 v1(144.524,83.825)
  other v1: 142.7,25.625 146.225,25.625 149.75,25.625 153.275,25.625 141,25.65 144.525,25.65 148.05,25.65 151.575,25.65 85.6,34.8 86.6,34.8 87.6,34.8 88.6,34.8 106.35,34.8 107.35,34.8 108.35,34.8 109.35,34.8 85.6,35.8 86.6,35.8 87.6,35.8 88.6,35.8 106.35,35.8 107.35,35.8 108.35,35.8 109.35,35.8 24.4,39.075 26.025,39.075 24.4,40.025 26.025,40.025 24.4,40.925 26.025,40.925 171.675,50.95 172.675,50.95 171.675,51.95 172.675,51.95 171.675,52.95 172.675,52.95 171.675,53.95 172.675,53.95 24.4,73.575 26.025,73.575 24.4,74.525 26.025,74.525 24.4,75.425 26.025,75.425 171.675,75.95 172.675,75.95 171.675,76.95 172.675,76.95 171.675,77.95 172.675,77.95 171.675,78.95 172.675,78.95 142.149,80.1 143.24,80.1 144.332,80.1 145.424,80.1 142.149,81.05 143.24,81.05 144.332,81.05 145.424,81.05 93.49,83.74 145.199,85.75 146.29,85.75 147.382,85.75 148.474,85.75 145.199,86.7 146.29,86.7 147.382,86.7 148.474,86.7 103.575,90.051 104.725,90.051 105.875,90.051 103.575,91.075 104.725,91.075 105.875,91.075 171.45,100.775 172.45,100.775 171.45,101.775 172.45,101.775 171.45,102.775 172.45,102.775 171.45,103.775 172.45,103.775 60.05,105.3 61,105.3 61.9,105.3 24.25,105.575 25.875,105.575 24.25,106.525 25.875,106.525 60.05,106.925 61,106.925 61.9,106.925 24.25,107.425 25.875,107.425 171.675,123.45 172.675,123.45 171.675,124.45 172.675,124.45 171.675,125.45 172.675,125.45 171.675,126.45 172.675,126.45 84.95,135.45 85.95,135.45 86.95,135.45 87.95,135.45 105.575,135.875 106.575,135.875 107.575,135.875 108.575,135.875 84.95,136.45 85.95,136.45 86.95,136.45 87.95,136.45 105.575,136.875 106.575,136.875 107.575,136.875 108.575,136.875 142.95,142.45 146.4,142.45 153.3,142.45 141.25,142.475 144.7,142.475 149.85,142.475 151.6,142.475 148.15,142.5
  other v2: 133.049,82.475 134.111,82.5 133.049,83.45 134.111,83.475 135.149,83.475 133.049,84.55 134.111,84.55 135.149,84.55
NetC1_1: C1.1 R2.1 R3.1 U1.4 | length 9.8
  Top Layer w0.25: R2.1@88.85,85.325 88.85,85.988 ; R3.1@88.85,86.652 88.85,85.988 ; 94.1,85.065 91.937,85.065 91.013,85.988 88.85,85.988 ; 94.775,84.9 95.125,84.9 96.012,84.013 U1.4@97.286,84.013
NetC2_1: C2.1 R5.1 R6.1 U1.6 | length 14.9
  Top Layer w0.2: v1(91.965,82.065) 92.057,82.065 92.486,82.495 94.376,82.495 C2.1@94.4,82.471 95.403,82.471 95.675,82.743 U1.6@97.286,82.743
  Top Layer w0.3: R5.1@85,83.978 85,84.602 ; R6.1@85,85.227 85,84.602 ; v1(86.95,84.65) 86.902,84.602 85,84.602
  Layer3_Inner w0.2: v1(86.95,84.65) 87.003,84.597 87.55,84.597 90.082,82.065 v1(91.965,82.065)
NetC3_2: C3.2 R8.1 R9.1 U1.8 | length 21.9
  Top Layer w0.2: R8.1@82.15,84.125 R9.1@82.15,85.877 ; 82.175,85.175 v1(83.825,85.175) ; v1(90.125,79.425) 90.696,79.996 C3.2@92.321,79.996
  Top Layer w0.25: C3.2@92.321,79.996 94.188,79.996 95.143,80.951 95.612,80.951 96.08,81.42 97.233,81.42 U1.8@97.286,81.473
  Layer3_Inner w0.2: v1(83.825,85.175) 83.825,82.625 87.454,78.996 89.146,78.996 89.525,79.375 90.075,79.375 v1(90.125,79.425)
NetC8_2: C8.2 C9.2 C10.1 C11.1 C12.2 C13.2 C14.2 C15.2 C16.2 C17.2 C18.2 C19.2 RS1.1 RS2.1 U14.3 U14.23 | length 116.4
  Top Layer w0.2: v1(137.049,34.175) 137.157,34.175 137.301,34.031 RS2.1@140.5,34.031 ; v1@139.44,133.99 139.934,134.483 RS1.1@142.428,134.483
  Top Layer w0.25: v1(133.349,78.7) U14.3@133.349,80.65
  Top Layer w0.5: v1(133.399,89.25) 133.399,87 133.724,86.675
  Layer3_Inner w0.2: 129.049,40.975 129.724,40.3 134.924,40.3 135.449,39.775 135.449,35.775 v1(137.049,34.175)
  Layer3_Inner w0.25: 129.049,40.975 129.049,64.049 133.999,68.999 133.999,78.05 v1(133.349,78.7)
  Layer3_Inner w1.5: 131.695,102.18 133.399,100.476 v1(133.399,89.25)
  Layer3_Inner w2: 131.695,102.18 131.695,103.092 130.524,104.263 130.524,126.45 134.424,130.35 138.258,130.35 139.43,131.522 v1(139.43,134)
NetC_BOOT1_1: C_BOOT1.1 U14.16 | length 2.4
  Top Layer w0.25: U14.16@136.999,85.3 137.874,85.3 137.999,85.425
  Top Layer w0.65: 137.999,85.425 139.296,85.425 C_BOOT1.1@139.299,85.422
NetC_BOOT1_2: C_BOOT1.2 L1.1 Q1.3 Q2.2 U14.17 | length 16.4
  Top Layer w0.25: U14.17@137.174,85.8 137.724,86.35
  Top Layer w0.65: Q1.3@136.017,99.35 136.017,97.036 137.616,95.437 137.616,88.793 138.656,88.793 139.299,88.15 139.299,87.45 ; 137.724,86.525 138.276,87.078 C_BOOT1.2@139.299,87.078
NetC_BOOT2_1: C_BOOT2.1 U14.11 | length 2.1
  Top Layer w0.2: U14.11@136.999,81.8 139.051,81.8 C_BOOT2.1@139.074,81.778